# Altium PCB NewFc.PcbDoc
Units mm, origin at the board's own origin, x right, y up, seen from the top; angles counter-clockwise.
Board outline 76.96 x 22.67 mm, 2 copper layers (Top Layer, Bottom Layer); 2 components, 36 nets, 80 pads, 0 vias.
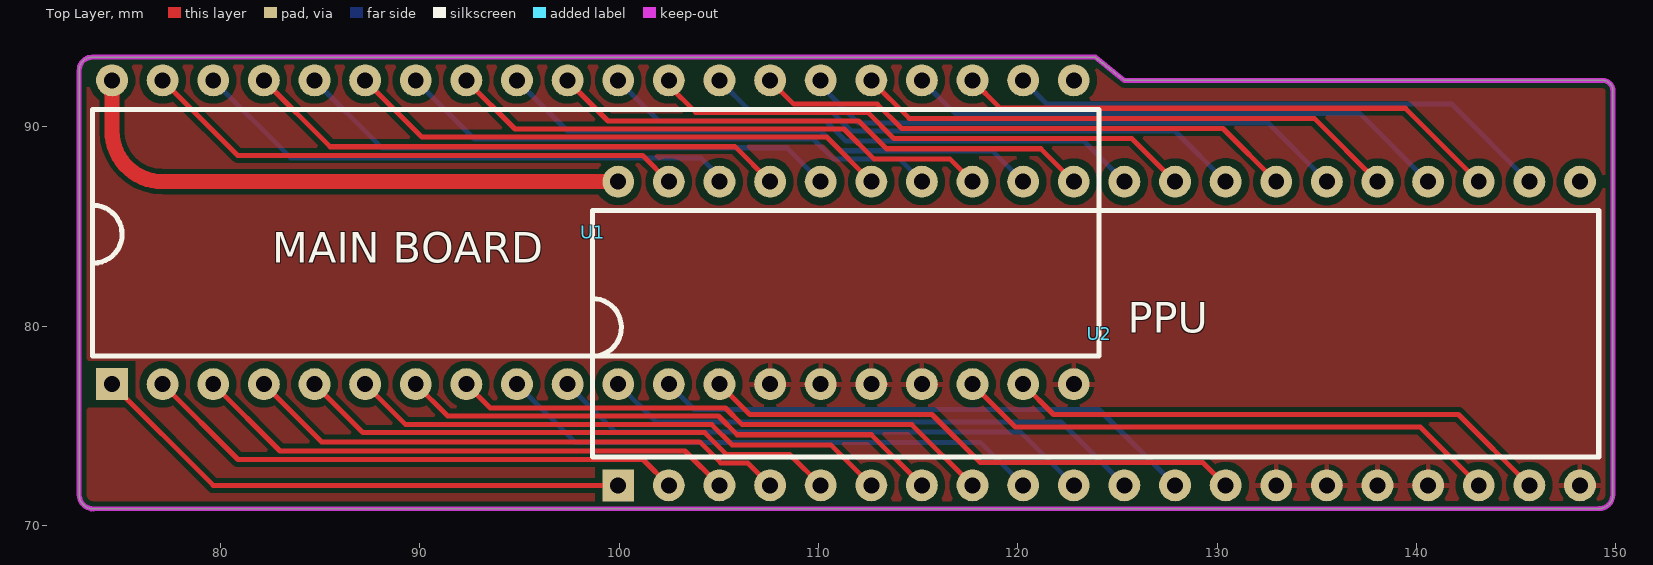
[diagram p0: Top Layer view]
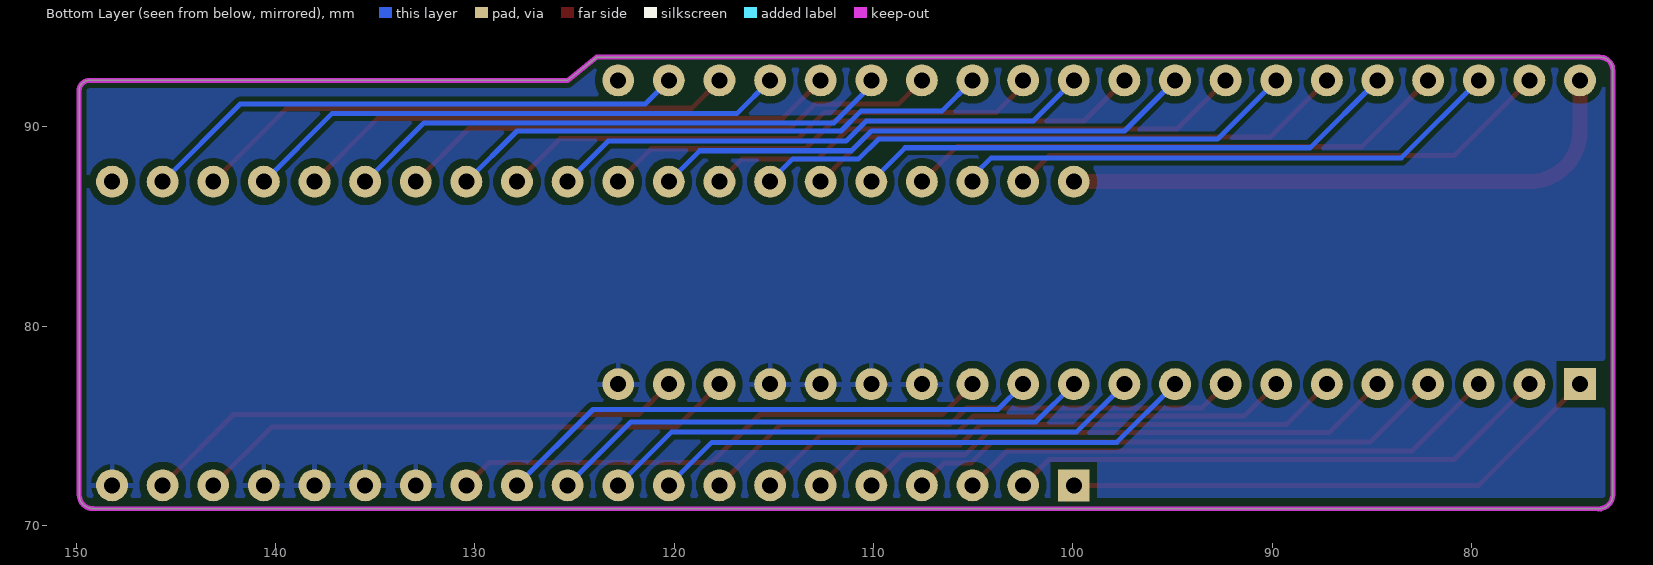
[diagram p1: Bottom Layer view, seen from below]

## Layer stack, top to bottom
Top Solder: solder mask 0.0102, Solder Resist, Dk 3.5
Top Layer: signal copper 0.0356
Dielectric 1: dielectric 0.32, FR-4, Dk 4.8
Bottom Layer: signal copper 0.0356
Bottom Solder: solder mask 0.0102, Solder Resist, Dk 3.5

## Board outline
72.898,71.54 ccw(c73.61,71.54) 73.61,70.828 149.168,70.841 ccw(c149.168,71.532) 149.86,71.532 149.86,91.821 ccw(c149.352,91.821) 149.352,92.329 125.349,92.329 123.888,93.497 73.558,93.497 ccw(c73.558,92.837) 72.898,92.837

## Design rules (kind name [scope] priority, off if disabled: settings)
Clearance [All] p1: gap=0.254 ignorepadtopadclearanceinfootprint=FALSE except(0: Arc-Hole Track-Hole SMDPad-Hole THPad-Hole Via-Hole Fill-Hole Poly-Hole Region-Hole Text-Hole; 0.152: Track-Track; 0.203: Track-THPad; 0.381: THPad-Poly)
PolygonConnect [All] p1: connectstyle=Relief reliefconductorwidth=0.254 reliefentries=4 polygonreliefangle="90 Angle" airgapwidth=0.254
RoutingVias [All] p1: holewidth=0.711 width=1.27 viastyle="Through Hole" minholewidth=0.711 minwidth=1.27 maxholewidth=0.711 maxwidth=1.27
SolderMaskExpansion [All] p1: expansion=0.102 istentingtop=FALSE
Width [All] p1: maxlimit=1.27 minlimit=0.254 preferedwidth=0.254
30 further rules are at their usual default settings.

## Components (designator, comment, footprint, x,y, rotation, side; value= is the part's Value field where it differs from the comment)
U1 "6528" DIP40 98.679,84.709 r90 top locked
U2 "6528" DIP40 124.079,79.629 r90 top locked

## Footprints (in the part's own frame and the unit in brackets; to place one, negate y for a bottom-side part, rotate by r counter-clockwise, add the part's x,y. Pads: shape width x height; smd on the part's side, far side on the other; paste and mask are expansions set on the pad)
DIP40 [mm]
  rect 1.6x1.6 hole 0.8: 1(-7.62,24.13)
  round 1.6 hole 0.8: 2(-7.62,21.59) 3(-7.62,19.05) 4(-7.62,16.51) 5(-7.62,13.97) 6(-7.62,11.43) 7(-7.62,8.89) 8(-7.62,6.35) 9(-7.62,3.81) 10(-7.62,1.27) 11(-7.62,-1.27) 12(-7.62,-3.81) 13(-7.62,-6.35) 14(-7.62,-8.89) 15(-7.62,-11.43) 16(-7.62,-13.97) 17(-7.62,-16.51) 18(-7.62,-19.05) 19(-7.62,-21.59) 20(-7.62,-24.13) 21(7.62,-24.13) 22(7.62,-21.59) 23(7.62,-19.05) 24(7.62,-16.51) 25(7.62,-13.97) 26(7.62,-11.43) 27(7.62,-8.89) 28(7.62,-6.35) 29(7.62,-3.81) 30(7.62,-1.27) 31(7.62,1.27) 32(7.62,3.81) 33(7.62,6.35) 34(7.62,8.89) 35(7.62,11.43) 36(7.62,13.97) 37(7.62,16.51) 38(7.62,19.05) 39(7.62,21.59) 40(7.62,24.13)
  body extent -7.91,-26.19 7.65,26.16, height 4.7

## Part data
U1 U2: library part UMC6528, "PPU"

## Nets (pads, with @x,y where several pads share a name; then routed paths per layer and width w, separated by ;. In a path a pad name is that pad's centre, name@x,y a point inside that pad or via, vN(x,y) a via of type N, cw(c..) or ccw(c..) an arc to the next point about the centre after c; other vN are vias at no path point)
+5: U1.40 U2.40 | length 29.4
  Top Layer w0.762: U1.40 74.549,89.789 ccw(c77.089,89.789) 77.089,87.249 U2.40
/RST: U1.22 U2.22 | length 27.5
  Bottom Layer w0.254: U1.22 121.463,91.135 141.783,91.135 U2.22
ALE: U1.39 U2.39 | length 27.5
  Top Layer w0.254: U1.39 80.848,88.57 101.168,88.57 U2.39
"CPU A0": U1.12 U2.12 | length 27.5
  Bottom Layer w0.254: U1.12 103.759,75.819 124.079,75.819 U2.12
"CPU A1": U1.11 U2.11 | length 27.5
  Bottom Layer w0.254: U1.11 101.854,75.184 122.174,75.184 U2.11
"CPU A2": U1.10 U2.10 | length 27.5
  Bottom Layer w0.254: U1.10 99.822,74.676 120.142,74.676 U2.10
DBE: U1.13 U2.13 | length 27.5
  Top Layer w0.254: U1.13 106.553,75.565 115.697,75.565 118.11,73.152 129.286,73.152 U2.13
GND: U1.14 U1.15 U1.16 U1.17 U1.20 U2.14 U2.15 U2.16 U2.17 U2.20
OUT_D0: U1.2 U2.2 | length 27.5
  Top Layer w0.254: U1.2 80.874,73.304 101.194,73.304 U2.2
OUT_D1: U1.3 U2.3 | length 27.5
  Top Layer w0.254: U1.3 82.982,73.736 103.302,73.736 U2.3
OUT_D2: U1.4 U2.4 | length 27.5
  Top Layer w0.254: U1.4 85.065,74.193 104.038,74.193 105.093,73.139 105.497,73.139 105.51,73.127 106.451,73.127 U2.4
OUT_D3: U1.5 U2.5 | length 27.5
  Top Layer w0.254: U1.5 87.147,74.651 104.292,74.651 105.397,73.546 108.572,73.546 U2.5
OUT_D4: U1.6 U2.6 | length 27.5
  Top Layer w0.254: U1.6 89.281,75.057 104.648,75.057 105.664,74.041 110.617,74.041 U2.6
OUT_D5: U1.7 U2.7 | length 27.5
  Top Layer w0.254: U1.7 91.389,75.489 104.978,75.489 105.918,74.549 112.649,74.549 U2.7
OUT_D6: U1.8 U2.8 | length 27.5
  Top Layer w0.254: U1.8 93.523,75.895 105.334,75.895 106.172,75.057 114.681,75.057 U2.8
OUT_D7: U1.9 U2.9 | length 27.5
  Bottom Layer w0.254: U1.9 97.79,74.168 118.11,74.168 U2.9
"PPU A8": U1.30 U2.30 | length 27.5
  Bottom Layer w0.254: U1.30 101.981,90.297 110.363,90.297 111.379,89.281 123.317,89.281 U2.30
"PPU A9": U1.29 U2.29 | length 27.7
  Top Layer w0.254: U1.29 102.489,92.075 103.835,90.729 112.471,90.729 113.792,89.408 125.73,89.408 U2.29
"PPU A10": U1.28 U2.28 | length 27.5
  Bottom Layer w0.254: U1.28 106.553,90.805 110.617,90.805 111.633,89.789 127.889,89.789 U2.28
"PPU A11": U1.27 U2.27 | length 27.5
  Top Layer w0.254: U1.27 108.763,91.135 112.954,91.135 114.173,89.916 130.302,89.916 U2.27
"PPU A12": U1.26 U2.26 | length 27.7
  Bottom Layer w0.254: U1.26 110.109,92.075 111.989,90.195 132.563,90.195 U2.26
"PPU A13": U1.25 U2.25 | length 27.5
  Top Layer w0.254: U1.25 114.554,90.424 134.874,90.424 U2.25
"PPU D0": U1.38 U2.38 | length 27.7
  Bottom Layer w0.254: U1.38 83.515,88.443 104.089,88.443 105.029,87.503 U2.38
"PPU D1": U1.37 U2.37 | length 27.5
  Top Layer w0.254: U1.37 85.496,89.002 105.816,89.002 U2.37
"PPU D2": U1.36 U2.36 | length 27.5
  Bottom Layer w0.254: U1.36 88.087,88.951 108.407,88.951 U2.36
"PPU D3": U1.35 U2.35 | length 27.5
  Top Layer w0.254: U1.35 90.094,89.484 110.414,89.484 U2.35
"PPU D4": U1.34 U2.34 | length 27.5
  Bottom Layer w0.254: U1.34 92.735,89.383 109.753,89.383 110.744,88.392 114.046,88.392 U2.34
"PPU D5": U1.33 U2.33 | length 27.5
  Top Layer w0.254: U1.33 94.767,89.891 111.277,89.891 112.776,88.392 116.586,88.392 U2.33
"PPU D6": U1.32 U2.32 | length 27.5
  Bottom Layer w0.254: U1.32 97.409,89.789 110.109,89.789 111.1,88.798 118.72,88.798 U2.32
"PPU D7": U1.31 U2.31 | length 27.5
  Top Layer w0.254: U1.31 99.441,90.297 112.014,90.297 113.411,88.9 121.158,88.9 U2.31
PPU_OUT_CLK: U1.18 U2.18 | length 27.5
  Top Layer w0.254: U1.18 119.888,74.93 140.208,74.93 U2.18
R/W: U1.1 U2.1 | length 27.5
  Top Layer w0.254: U1.1 79.629,72.009 U2.1
RD: U1.24 U2.24 | length 27.5
  Bottom Layer w0.254: U1.24 116.84,90.678 137.16,90.678 U2.24
VBL: U1.19 U2.19 | length 27.5
  Top Layer w0.254: U1.19 121.793,75.565 142.113,75.565 U2.19
VOUT: 
WE: U1.23 U2.23 | length 27.5
  Top Layer w0.254: U1.23 119.126,90.932 139.446,90.932 U2.23
pads on no net: U1.21 U2.21

## Polygon pours and split planes (outlines as drawn)
GND on Bottom Layer "GND_L02_P000" (solid, pour order 0): 72.898,93.472 73.025,93.345 124.079,93.345 125.349,92.329 149.86,92.329 150.368,70.485 73.025,70.485
GND on Top Layer "GND_L01_P001" (solid, pour order 1): 72.898,71.54 ccw(c73.61,71.54) 73.61,70.828 149.168,70.841 ccw(c149.168,71.532) 149.86,71.532 149.86,91.821 ccw(c149.352,91.821) 149.352,92.329 125.349,92.329 123.888,93.497 73.558,93.497 ccw(c73.558,92.837) 72.898,92.837

## Keep-outs
Keep-Out Layer:
  the board outline again, w0.254

## Silkscreen, mask and mechanical layers (free items; w line width, h text height)
Top Overlay:
  lines w0.254: 73.605,86.057 cw(c73.605,84.609) 73.631,83.161 ; 98.661,81.386 cw(c98.661,79.938) 98.686,78.49 ; 73.579,78.499 124.073,78.499 124.073,90.865 73.579,90.865 73.579,78.499 ; 98.657,73.425 149.151,73.425 149.151,85.791 98.657,85.791 98.657,73.425
  text "MAIN BOARD" at 82.599,83.17 h1.52
  text "PPU" at 125.518,79.655 h1.52
Top Solder:
  text "LAVA RGB" at 104.775,81.102 h3.52